# Altium PCB pcb.pcbdoc (part 1 of 2)
Units mil, origin at the board's own origin, x right, y up, seen from the top; angles counter-clockwise.
Board outline 4735 x 3735 mil, 2 copper layers (Top Layer, Bottom Layer); 22 components, 42 nets, 118 pads, 18 vias.
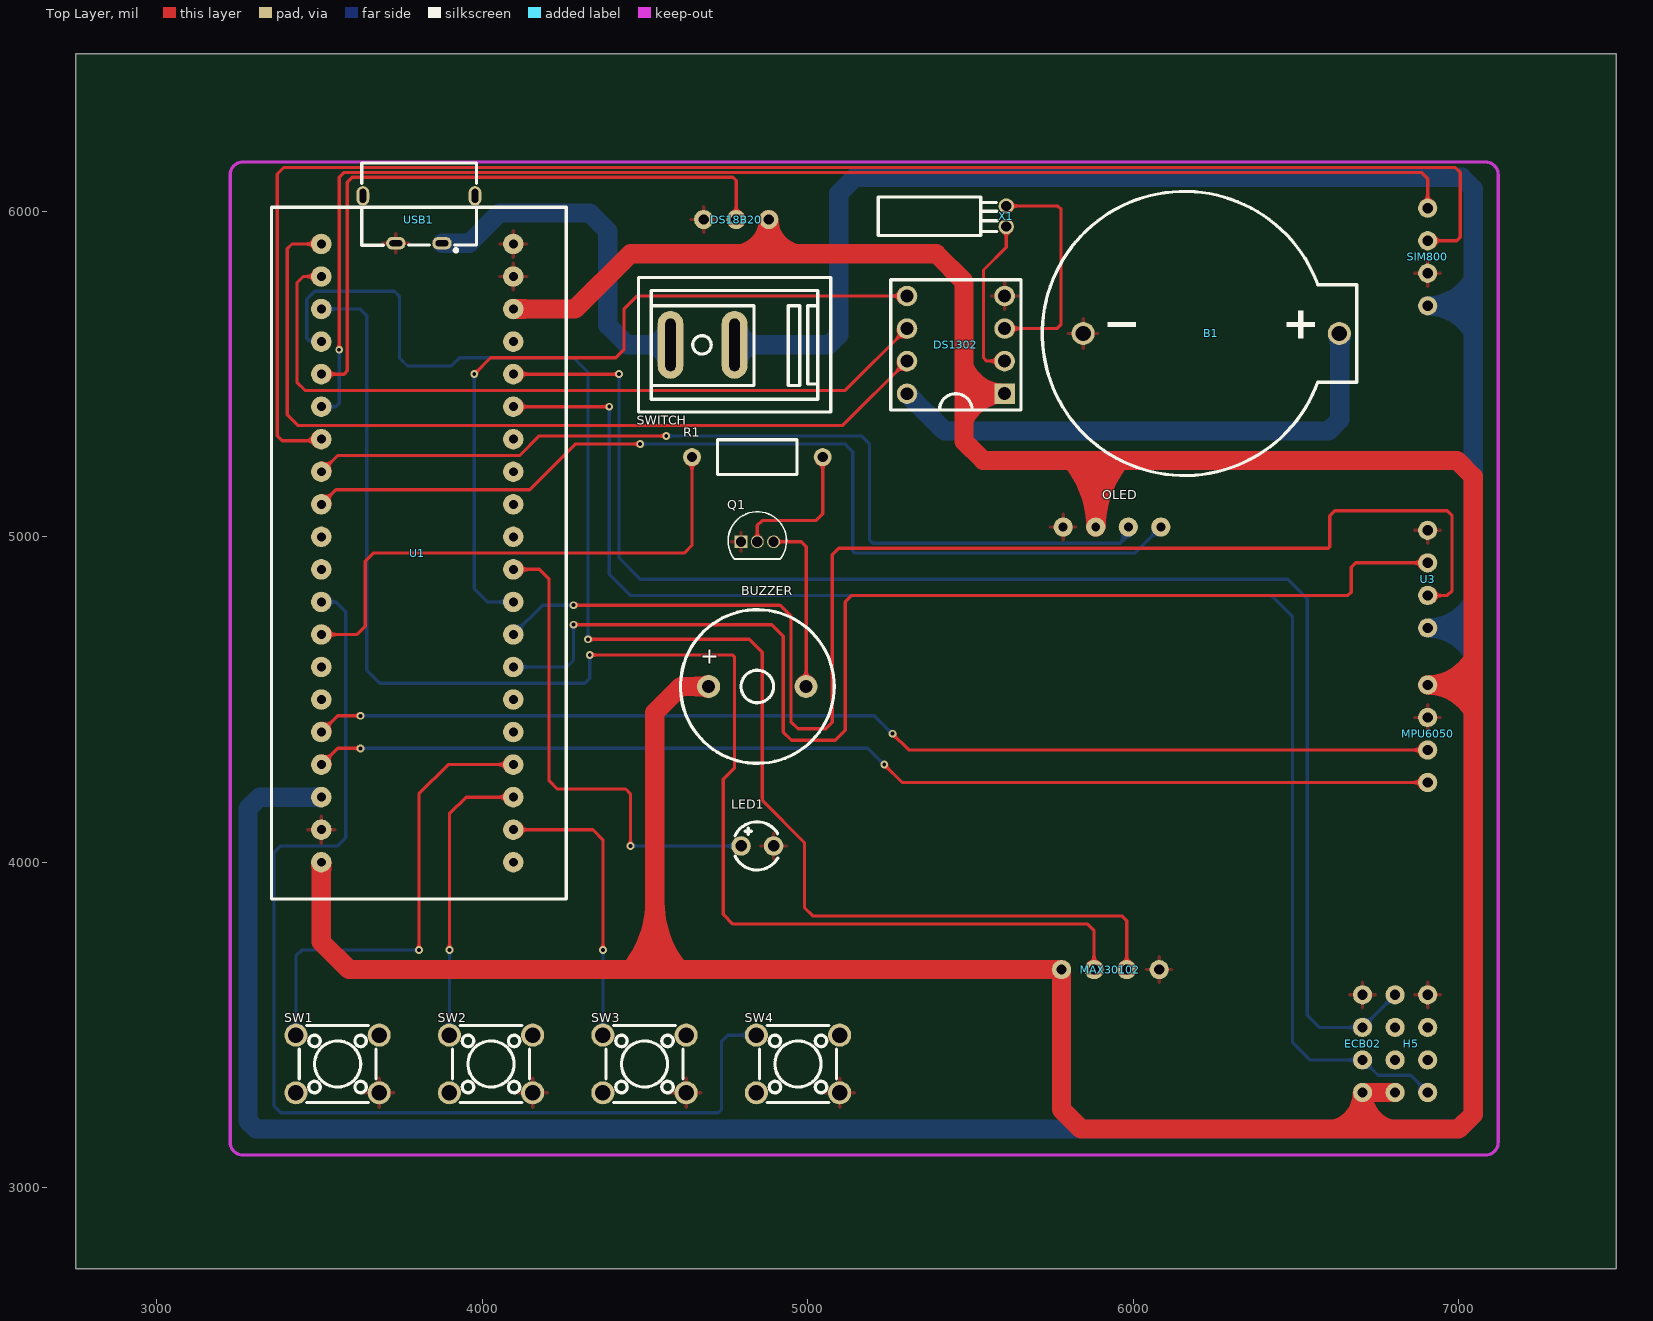
[diagram p0: Top Layer view]
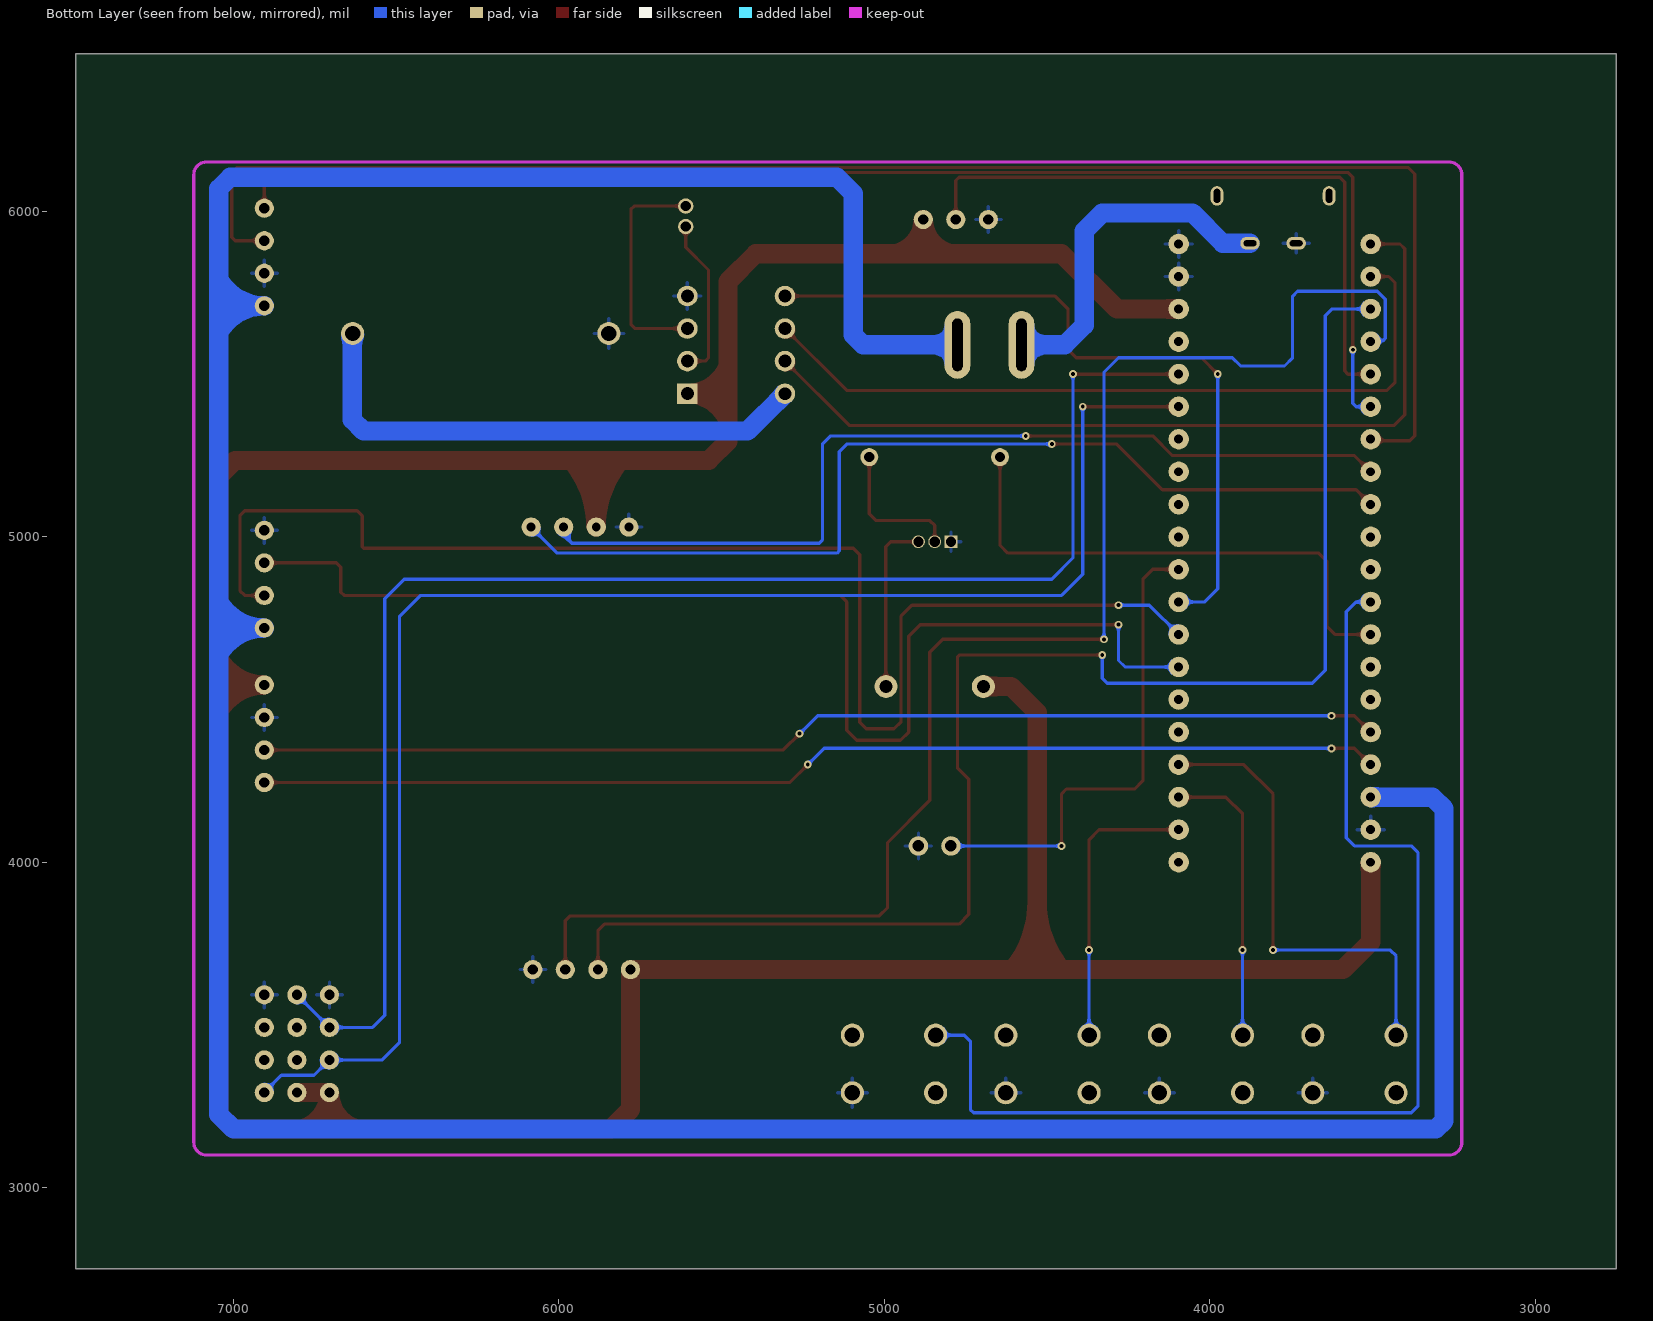
[diagram p1: Bottom Layer view, seen from below]

## Layer stack, top to bottom
Top Layer: signal copper (thickness not stored)
Dielectric: dielectric 12.6, FR-4, Dk 4.8
Bottom Layer: signal copper (thickness not stored)

## Board outline
7485,2750 2750,2750 2750,6485 7485,6485

## Design rules (kind name [scope] priority, off if disabled: settings)
Clearance copperThickness1oz [All] p1: gap=7 ignorepadtopadclearanceinfootprint=FALSE except(4: Track-Track; 6: Track-SMDPad SMDPad-SMDPad Track-THPad SMDPad-THPad THPad-THPad Track-Via SMDPad-Via THPad-Via Via-Via Track-Fill SMDPad-Fill THPad-Fill Via-Fill Fill-Fill SMDPad-Region THPad-Region Via-Region Fill-Region Region-Region SMDPad-Poly THPad-Poly Via-Poly Fill-Poly Poly-Poly Track-Text SMDPad-Text THPad-Text Via-Text Fill-Text Region-Text Text-Text Track-Sheet SMDPad-Sheet THPad-Sheet Via-Sheet Fill-Sheet Region-Sheet Poly-Sheet Text-Sheet Track-Hole SMDPad-Hole THPad-Hole Via-Hole Fill-Hole Region-Hole Poly-Hole Text-Hole Sheet-Hole; 11.8: Track-Region Track-Poly Region-Poly Poly-Text)
Clearance copperThickness2oz [All] p1: gap=7 ignorepadtopadclearanceinfootprint=FALSE except(6: Track-SMDPad SMDPad-SMDPad Track-THPad SMDPad-THPad THPad-THPad Track-Via SMDPad-Via THPad-Via Via-Via Track-Fill SMDPad-Fill THPad-Fill Via-Fill Fill-Fill SMDPad-Region THPad-Region Via-Region Fill-Region Region-Region SMDPad-Poly THPad-Poly Via-Poly Fill-Poly Poly-Poly Track-Text SMDPad-Text THPad-Text Via-Text Fill-Text Region-Text Text-Text Track-Sheet SMDPad-Sheet THPad-Sheet Via-Sheet Fill-Sheet Region-Sheet Poly-Sheet Text-Sheet Track-Hole SMDPad-Hole THPad-Hole Via-Hole Fill-Hole Region-Hole Poly-Hole Text-Hole Sheet-Hole; 8: Track-Track; 11.8: Track-Region Track-Poly Region-Poly Poly-Text)
DiffPairsRouting differentialPair [All] p1: maxuncoupledlength=10 maxlimit=6 mostfreqgap=6 toplayer_minwidth=5 toplayer_prefwidth=10 toplayer_maxwidth=100 bottomlayer_minwidth=5 bottomlayer_prefwidth=10 bottomlayer_maxwidth=100
PasteMaskExpansion pasteMaskExpansion [All] p1:
PlaneConnect innerPlane [All] p1: planeconnectstyle=Relief reliefexpansion=20 reliefentries=4 reliefconductorwidth=10 reliefairgap=10
PolygonConnect copperRegion [All] p1: connectstyle=Relief reliefentries=4 reliefconductorwidth=10 polygonreliefangle="90 Angle" airgapwidth=10
RoutingVias viaSize [All] p1: viastyle="Through Hole" holewidth=12.0078 minholewidth=11.811 maxholewidth=248.0314 width=24.0158 minwidth=19.685 maxwidth=393.7008
SolderMaskExpansion solderMaskExpansion [All] p1: useseparateexpansions=TRUE expansion=2 expansionbottom=2
Width copperThickness1oz [All] p1: maxlimit=100 minlimit=5 preferedwidth=10
Width copperThickness2oz [All] p1: maxlimit=100 minlimit=8 preferedwidth=10

## Components (designator, comment, footprint, x,y, rotation, side; value= is the part's Value field where it differs from the comment)
B1 "BS-02-A1AJ010" BAT-TH_BS-02-A1AJ010 6240,5625 r0 top
BUZZER "SUN-12075-5VPA7.6" BUZ-TH_BD12.0-P7.60-D0.6-FD 4845,4540 r0 top
DS18B20 "PZ254V-11-03P" HDR-TH_3P-P2.54-V-M 4780,5975 r0 top
DS1302 "DS1009-08AT1NX-0A2" DIP-8_L10.2-W10.2-P2.54-LS7.6-BL 5455,5590 r90 top
ECB02 "ECB02" HDR-TH_4P-P2.54-V-F 6705,3442.44 r270 top
H5 "ESP8266" HDR-TH_8P-P2.54-V-F-R2-C4-S2.54 6855,3442.44 r270 top
LED1 "LED" LED-TH_BD3.8-P2.54-FD_GREEN 4845,4050 r0 top
MAX30102 "MAX30102" HDR-TH_4P-P2.54-V-F 5930,3670 r180 top
MPU6050 "MPU6050" HDR-TH_4P-P2.54-V-F 6905,4395 r90 top
OLED "OLED" 0.96OLED_4P 5935,5030 r0 top
Q1 "SS8050_C2931495" TO-92-3_L4.6-W3.6-P1.27-L 4845,4985 r0 top
R1 "MF1/4W-1K±1%-ST52" RES-TH_BD2.7-L6.2-P10.20-D0.4 4845,5245 r0 top
SIM800 "SIM800" HDR-TH_4P-P2.54-V-F 6905,5860 r90 top
SW1 "TS665CJ" SW-TH_4P-L6.0-W6.0-P4.50-LS6.5 3555,3380 r0 top
SW2 "TS665CJ" SW-TH_4P-L6.0-W6.0-P4.50-LS6.5 4026.67,3380 r0 top
SW3 "TS665CJ" SW-TH_4P-L6.0-W6.0-P4.50-LS6.5 4498.33,3380 r0 top
SW4 "TS665CJ" SW-TH_4P-L6.0-W6.0-P4.50-LS6.5 4970,3380 r0 top
SWITCH "开关" KCD11-101 4775,5590 r0 top
U1 "STM32F103C8T6" STM32F103C8T6 3805,4950 r0 top
U3 "PZ254V-11-04P" HDR-TH_4P-P2.54-V-M 6905,4870 r270 top
USB1 "Type-C供电" USB-SMD_KH-TYPE-C-2P 3805,5975 r180 top
X1 "X308032768KGB2SC" OSC-TH_BD3.1-P0.8-D0.3 5610,5985 r0 top

## Footprints (in the part's own frame and the unit in brackets; to place one, negate y for a bottom-side part, rotate by r counter-clockwise, add the part's x,y. Pads: shape width x height; smd on the part's side, far side on the other; paste and mask are expansions set on the pad)
0.96OLED_4P [mm]
  round 1.5 hole 0.7 copper offset 0,0: 1(-3.81,-0.002) 2(-1.27,0.001) 3(1.27,0.001) 4(3.81,0.001)
BAT-TH_BS-02-A1AJ010 [mm]
  round 1.8 hole 1.2: 1(-10,0) 2(10,0)
  silkscreen extent -13.19,-11.09 11.36,11.09
BUZ-TH_BD12.0-P7.60-D0.6-FD [mil]
  round 70.9 hole 39.4: 1(-149.6,0) 2(149.6,0)
  silkscreen extent -236,-236 236,236
DIP-8_L10.2-W10.2-P2.54-LS7.6-BL [mm]
  rect 1.6x1.6 hole 1: 1(-3.808,-3.81)
  round 1.6 hole 1: 2(-1.27,-3.81) 3(1.27,-3.81) 4(3.81,-3.81) 5(3.81,3.81) 6(1.27,3.81) 7(-1.27,3.81) 8(-3.81,3.81)
  silkscreen extent -5.08,-5.08 5.08,5.08
HDR-TH_3P-P2.54-V-M [mm]
  round 1.5 hole 0.8: 1(-2.54,0) 2(0,0) 3(2.54,0)
HDR-TH_4P-P2.54-V-F [mm]
  round 1.5 hole 0.8: 1(-3.81,0) 2(-1.27,0) 3(1.27,0) 4(3.81,0)
HDR-TH_4P-P2.54-V-M [mm]
  round 1.5 hole 0.8: 1(-3.81,0) 2(-1.27,0) 3(1.27,0) 4(3.81,0)
HDR-TH_8P-P2.54-V-F-R2-C4-S2.54 [mm]
  round 1.5 hole 0.8: 1(-3.81,-1.27) 2(-3.81,1.27) 3(-1.27,-1.27) 4(-1.27,1.27) 5(1.27,-1.27) 6(1.27,1.27) 7(3.81,-1.27) 8(3.81,1.27)
KCD11-101 [mm]
  oval 2x5.3 hole 0.8 slot 4.1 at 90 deg: 1(0,0) 2(-5,0)
  silkscreen extent -7.5,-5.25 7.5,5.25
LED-TH_BD3.8-P2.54-FD_GREEN [mil]
  round 60 hole 35.43: 1(-50,0) 2(50,0)
  silkscreen extent -68,-74 63,74
OSC-TH_BD3.1-P0.8-D0.3 [mm]
  round 1.2 hole 0.8: 1(0,0.8) 2(0,-0.8)
  silkscreen extent -10,-1.5 -0.7,1.5
RES-TH_BD2.7-L6.2-P10.20-D0.4 [mm]
  round 1.4 hole 0.8 copper offset 0,0: 1(-5.1,0) 2(5.1,0)
  silkscreen extent -3.1,-1.35 3.1,1.35
STM32F103C8T6 [mm]
  round 1.6 hole 0.7: 1(-7.62,24.13) 2(-7.62,21.59) 3(-7.62,19.05) 4(-7.62,16.51) 5(-7.62,13.97) 6(-7.62,11.43) 7(-7.62,8.89) 8(-7.62,6.35) 9(-7.62,3.81) 10(-7.62,1.27) 11(-7.62,-1.27) 12(-7.62,-3.81) 13(-7.62,-6.35) 14(-7.62,-8.89) 15(-7.62,-11.43) 16(-7.62,-13.97) 17(-7.62,-16.51) 18(-7.62,-19.05) 19(-7.62,-21.59) 20(-7.62,-24.13) 21(7.366,-24.13) 22(7.366,-21.59) 23(7.366,-19.05) 24(7.366,-16.51) 25(7.366,-13.97) 26(7.366,-11.43) 27(7.366,-8.89) 28(7.366,-6.35) 29(7.366,-3.81) 30(7.366,-1.27) 31(7.366,1.27) 32(7.366,3.81) 33(7.366,6.35) 34(7.366,8.89) 35(7.366,11.43) 36(7.366,13.97) 37(7.366,16.51) 38(7.366,19.05) 39(7.366,21.59) 40(7.366,24.13)
  silkscreen extent -11.5,-27 11.5,27
SW-TH_4P-L6.0-W6.0-P4.50-LS6.5 [mm]
  round 1.8 hole 1.2: 1(-3.25,2.25) 2(3.25,2.25) 3(-3.25,-2.25) 4(3.25,-2.25)
  silkscreen extent -3,-3 3,3
TO-92-3_L4.6-W3.6-P1.27-L [mm]
  rect 1x1 hole 0.8: 1(-1.27,0)
  round 1 hole 0.8: 2(0,0) 3(1.27,0)
  silkscreen extent -2.28,-1.35 2.28,2.34
USB-SMD_KH-TYPE-C-2P [mm]
  oval 1.524x1 hole 0.45 slot 1 at 0 deg: 1(-1.8,1.85) 2(1.8,1.85)
  oval 1x1.524 hole 0.5 slot 1.1 at 90 deg: 3(4.375,-1.85) 4(-4.375,-1.85)
  silkscreen extent -4.5,-4.41 4.46,2.53

## Via types
v1: diameter 24.02, hole 12.01, Top Layer to Bottom Layer, 18 vias

## Nets (pads, with @x,y where several pads share a name; then routed paths per layer and width w, separated by ;. In a path a pad name is that pad's centre, name@x,y a point inside that pad or via, vN(x,y) a via of type N, cw(c..) or ccw(c..) an arc to the next point about the centre after c; other vN are vias at no path point)
3V3: BUZZER.1 DS18B20.3 DS1302.1 ECB02.4 H5.7 MAX30102.4 MPU6050.4 OLED.2 U1.20 U1.38 | length 11621.8
  Top Layer w59.06: U1.20@3505,4000 3505,3755 3590,3670 4529.94,3670 MAX30102.4@5780,3670 5780,3240 5840,3180 6705,3180 ; U1.38@4095,5700 4285,5700 4455,5870 4880,5870 ; 4530,3670.06 4530,4460 4610,4540 BUZZER.1@4695.4,4540 ; DS18B20.3@4880,5975 4880,5870 ; DS1302.1@5604.94,5440 5480,5440 ; OLED.2@5885.01,5030.04 5885.67,5030.72 5885.67,5234.33 5885,5235 ; H5.7@6805,3292.44 ECB02.4@6705,3292.44 6705,3180 ; MPU6050.4@6905,4545 7045,4545 ; 4880,5870 5395,5870 5480,5785 5480,5440 ; 5480,5440 5480,5294.06 5539.06,5235 5885,5235 ; 5885,5235 6995,5235 7045,5185 7045,4545 ; 6705,3180 7000,3180 7045,3225 7045,4545
5V: SWITCH.2 USB1.1 | length 1078.4
  Bottom Layer w59.06: USB1.1@3875.87,5902.16 3959.39,5902.16 4052.22,5995 4330,5995 4385,5940 4385,5650 4445,5590 SWITCH.2@4578.15,5590
5VOUT: SIM800.1 SWITCH.1 U1.18 U3.4 | length 10871.3
  Bottom Layer w59.06: U1.18@3505,4200 3315,4200 3280,4165 3280,3205 3305,3180 7000,3180 7045,3225 7045,4720 ; SWITCH.1@4775,5590 5065,5590 5095,5620 5095,6055 5145,6105 7010,6105 7045,6070 7045,5709.67 ; U3.4@6905,4720 7045,4720 ; SIM800.1@6905,5710 7044.67,5710 7045,5709.67 ; 7045,4720 7045,5709.67
$1N333: BUZZER.2 Q1.3 | length 536.4
  Top Layer w10: Q1.3@4895,4985 4980,4985 4995,4970 4995,4540.4 BUZZER.2@4994.6,4540
$1N1842: DS1302.2 X1.2 | length 501.6
  Top Layer w10: DS1302.2@5605,5540 5550,5540 5540,5550 5540,5820 5610,5890 X1.2@5610,5953.49
$1N1848: DS1302.3 X1.1 | length 704.7
  Top Layer w10: DS1302.3@5605,5640 5765,5640 5778.5,5653.5 5778.5,6006.5 5768.5,6016.5 X1.1@5610,6016.5
$1N1852: B1.2 DS1302.8 | length 1657.7
  Bottom Layer w59.06: DS1302.8@5305,5440 5420,5325 6600,5325 6635,5360 6635,5623.7 B1.2@6633.69,5625
$1N2304: Q1.2 R1.2 | length 439.8
  Top Layer w10: Q1.2@4845,4985 4845,5035 4860,5050 5025,5050 5045.79,5070.79 R1.2@5045.8,5245
GND: B1.1 DS18B20.1 DS1302.4 ECB02.1 H5.2 LED1.2 MAX30102.1 MPU6050.3 OLED.1 Q1.1 SIM800.2 SW1.4 SW2.4 SW3.4 SW4.4 U1.19 U1.39 U1.40 U3.1 USB1.2
PA0: U1.25
PA1: U1.26
PA2: U1.27 U3.2 | length 3750.1
  Top Layer w10: v1(4280,4730) 4890,4730 4925,4695 4925,4400 4950,4375 5085,4375 5115,4405 5115,4800 5135,4820 6175,4820 6660,4820 6670,4830 6670,4906.48 6683.52,4920 U3.2@6905,4920
  Bottom Layer w10: U1.27@4095,4600 4260,4600 4280,4620 v1(4280,4730)
PA3: U1.28 U3.3 | length 4222.3
  Top Layer w10: v1(4280,4790) 4915,4790 4948.17,4756.83 4948.17,4431.83 4970,4410 5055,4410 5075,4430 5075,4945 5095,4965 6600,4965 6604.13,4969.13 6604.13,5064.13 6620,5080 6965,5080 6980,5065 6980,4835 6965,4820 U3.3@6905,4820
  Bottom Layer w10: U1.28@4095,4700 4185,4790 v1(4280,4790)
PA4: DS1302.5 U1.29 | length 2299.2
  Top Layer w10: v1(3975,5500) 4025,5550 4410,5550 4435,5575 4435,5700 4475,5740 DS1302.5@5305,5740
  Bottom Layer w10: v1(3975,5500) 3975,4840 4015,4800 U1.29@4095,4800
PA5: LED1.1 U1.30 | length 1509
  Top Layer w10: U1.30@4095,4900 4175,4900 4205,4870 4205,4250 4230,4225 4440,4225 4455,4210 v1(4455,4050)
  Bottom Layer w10: v1(4455,4050) LED1.1@4795,4050
PA6: U1.31
PA7: U1.32
PA8: DS18B20.2 U1.5 | length 1989.5
  Top Layer w10: U1.5@3505,5500 3575,5500 3585,5510 3585,6090 3600,6105 4770,6105 4780,6095 DS18B20.2@4780,5975
PA9: SIM800.4 U1.6 | length 4203.6
  Top Layer w10: v1(3560,5575) 3560,6105 3575,6120 6885,6120 6905,6100 SIM800.4@6905,6010
  Bottom Layer w10: U1.6@3505,5400 3550,5400 3560,5410 v1(3560,5575)
PA10: SIM800.3 U1.7 | length 4901.9
  Top Layer w10: U1.7@3505,5300 3500,5295 3385,5295 3370,5310 3370,6115 3390,6135 6990,6135 7005,6120 7005,5920 6995,5910 SIM800.3@6905,5910
PA11: OLED.3 U1.8 | length 2870.5
  Top Layer w10: U1.8@3505,5200 3555,5250 4115,5250 4175,5310 v1(4565,5310)
  Bottom Layer w10: v1(4565,5310) 5165,5310 5190,5285 5190,4990 5200,4980 5960,4980 5985,5005 OLED.3@5985.01,5030.04
PA12: OLED.4 U1.9 | length 3007.2
  Top Layer w10: U1.9@3505,5100 3550,5145 4145,5145 4285,5285 v1(4485,5285)
  Bottom Layer w10: v1(4485,5285) 5115,5285 5137.93,5262.07 5137.93,4957.07 5145,4950 6004.95,4950 OLED.4@6085.01,5030.04
PA15: U1.10
PB0: U1.33
PB1: U1.34
PB3: U1.11
PB4: SW4.1 U1.12 | length 3513.2
  Bottom Layer w10: U1.12@3505,4800 3550,4800 3580,4770 3580,4075 3555,4050 3380,4050 3360,4030 3360,3250 3380,3230 4725,3230 4735,3240 4735,3450 4753.58,3468.58 SW4.1@4842.05,3468.58
PB5: R1.1 U1.13 | length 1640.7
  Top Layer w10: U1.13@3505,4700 3615,4700 3640,4725 3640,4925 3665,4950 4620,4950 4644.21,4974.21 R1.1@4644.2,5245
PB6: U1.14
PB7: U1.15
PB8: MPU6050.2 U1.16 | length 3464.2
  Top Layer w10: U1.16@3505,4400 3555,4450 v1(3625,4450) ; v1(5260,4395) 5310,4345 MPU6050.2@6905,4345
  Bottom Layer w10: v1(3625,4450) 5205,4450 v1(5260,4395)
PB9: MPU6050.1 U1.17 | length 3464.2
  Top Layer w10: U1.17@3505,4300 3555,4350 v1(3625,4350) ; v1(5235,4300) 5290,4245 MPU6050.1@6905,4245
  Bottom Layer w10: v1(3625,4350) 5185,4350 v1(5235,4300)
PB10: ECB02.3 H5.8 U1.35 | length 4752
  Top Layer w10: U1.35@4095,5400 v1(4390,5400)
  Bottom Layer w10: v1(4390,5400) 4390,4885 4455,4820 6425,4820 6490,4755 6490,3445 6542.54,3392.46 ECB02.3@6705,3392.44 6752.44,3345 6852.44,3345 H5.8@6905,3292.44
PB11: ECB02.2 H5.1 U1.36 | length 4677
  Top Layer w10: U1.36@4095,5500 v1(4420,5500)
  Bottom Layer w10: v1(4420,5500) 4420,4935 4485,4870 6475,4870 6535,4810 6535,3530 6572.54,3492.46 ECB02.2@6705,3492.46 ; ECB02.2@6718.28,3492.46 ECB02.2@6705.02,3492.46 ; H5.1@6805,3592.44 ECB02.2@6705.02,3492.46
PB12: DS1302.7 U1.1 | length 2621.5
  Top Layer w10: U1.1@3505,5900 3415,5900 3400,5885 3400,5375 3432.52,5342.48 5107.48,5342.48 DS1302.7@5305,5540
PB13: DS1302.6 U1.2 | length 2352.3
  Top Layer w10: U1.2@3505,5800 3450,5800 3430,5780 3430,5475 3455,5450 5115,5450 DS1302.6@5305,5640
PB14: MAX30102.3 U1.3 | length 4551.3
  Top Layer w10: v1(4330,4637.07) 4767.93,4637.07 4775,4630 4775,4290 4740,4255 4740,3840 4770,3810 5860,3810 5880,3790 MAX30102.3@5880,3670
  Bottom Layer w10: U1.3@3505,5700 3625,5700 3645,5680 3645,4590 3685,4550 4315,4550 4330,4565 v1(4330,4637.07)
PB15: MAX30102.2 U1.4 | length 4647
  Top Layer w10: v1(4325,4685) 4820,4685 4860,4645 4860,4190 4990,4060 4990,3860 5015,3835 5965,3835 5980,3820 MAX30102.2@5980,3670
  Bottom Layer w10: U1.4@3505,5600 3502.07,5602.93 3467.07,5602.93 3460,5610 3460,5730 3485,5755 3730,5755 3745,5740 3745,5550 3770,5525 3905,5525 3930,5550 4280,5550 4325,5505 v1(4325,4685)
PC13: SW3.1 U1.22 | length 889
  Top Layer w10: U1.22@4095,4100 4340,4100 4370.38,4069.62 v1(4370.38,3730)
  Bottom Layer w10: SW3.1@4370.39,3468.58 v1(4370.38,3730)
PC14: SW2.1 U1.23 | length 897.7
  Top Layer w10: v1(3898.72,3730) 3898.72,4148.72 3950,4200 U1.23@4095,4200
  Bottom Layer w10: SW2.1@3898.72,3468.58 v1(3898.72,3730)
PC15: 
VB: U1.21
pads on no net: H5.3 H5.4 H5.5 H5.6 SW1.1 SW1.2 SW1.3 SW2.2 SW2.3 SW3.2 SW3.3 SW4.2 SW4.3 U1.24 U1.37 USB1.3 USB1.4
copper on no net: | length 1436.1
  Top Layer w10: v1(3805,3730) 3805,4210 3895,4300 4095,4300
  Bottom Layer w10: 3427.05,3468.58 3427.05,3712.05 3445,3730 v1(3805,3730)

## Polygon pours and split planes (outlines as drawn)
GND on Top Layer (solid, remove dead copper): 3000,3000 7225,3000 7225,6165 3000,6165
GND on Bottom Layer (solid, remove dead copper, pour order 2): 3040,3000 7235,3000 7235,6235 3040,6235

## Keep-outs
Board Outline Layer:
  lines w10: 3225,3139.37 ccw(c3264.37,3139.37) 3264.37,3100 7082.64,3100 ccw(c7082.64,3139.37) 7122.01,3139.37 7122.01,6112.64 ccw(c7082.64,6112.64) 7082.64,6152.01 3264.37,6152.01 ccw(c3264.37,6112.64) 3225,6112.64 3225,3139.37

## Other copper
Top Layer:
  region net $1N333: 4990,4588.74 5000,4588.15 5000.12,4585.34 5000.48,4582.94 5001.05,4580.9 5001.83,4579.16 5002.79,4577.68 5003.93,4576.4 5005.22,4575.27 5006.65,4574.24 5013.47,4570.07 5015.37,4568.76 5017.32,4567.23 5019.29,4565.44 5021.29,4563.33 4968.45,4563.93 4970.46,4565.97 4972.47,4567.72 4976.36,4570.53 4980,4572.75 4983.26,4574.77 4984.71,4575.83 4986.02,4576.98 4987.17,4578.29 4988.15,4579.79 4988.93,4581.54 4989.52,4583.58 4989.88,4585.96
  region net 3V3: 4652.86,4510.47 4652.86,4569.53 4660.75,4569.78 4668.34,4570.45 4675.4,4571.4 4681.73,4572.49 4691.32,4574.52 4695.4,4575.45 4695.4,4504.55 4691.32,4505.48 4681.73,4507.51 4675.4,4508.6 4668.34,4509.55 4660.75,4510.22
  region net 3V3: 5856.14,5051.39 5915.2,5079.58 5915.11,5078.95 5914.86,5078.3 5913.91,5076.89 5912.44,5075.39 5910.57,5073.81 5905.95,5070.56 5900.85,5067.33 5896.05,5064.35 5892.33,5061.81 5891.11,5060.77 5890.46,5059.92 5890.38,5059.58 5890.48,5059.3 5890.76,5059.07 5891.25,5058.91 5855.48,5030.72 5855.87,5041.05
  region net PB12: 3461.96,5895 3461.96,5905 3464.37,5905.11 3466.46,5905.41 3468.25,5905.91 3469.79,5906.59 3471.13,5907.42 3472.3,5908.41 3473.34,5909.53 3474.3,5910.77 3478.15,5916.69 3480.66,5920.03 3482.21,5921.75 3484,5923.48 3484,5876.52 3482.21,5878.25 3480.66,5879.97 3478.15,5883.31 3474.3,5889.23 3473.34,5890.47 3472.3,5891.59 3471.13,5892.58 3469.79,5893.41 3468.25,5894.09 3466.46,5894.59 3464.37,5894.89
  region net PB13: 3461.96,5795 3461.96,5805 3464.37,5805.11 3466.46,5805.41 3468.25,5805.91 3469.79,5806.59 3471.13,5807.42 3472.3,5808.41 3473.34,5809.53 3474.3,5810.77 3478.15,5816.69 3480.66,5820.03 3482.21,5821.75 3484,5823.48 3484,5776.52 3482.21,5778.25 3480.66,5779.97 3478.15,5783.31 3474.3,5789.23 3473.34,5790.47 3472.3,5791.59 3471.13,5792.58 3469.79,5793.41 3468.25,5794.09 3466.46,5794.59 3464.37,5794.89
  region net PA8: 3548.04,5505 3548.04,5495 3545.63,5494.89 3543.54,5494.59 3541.75,5494.09 3540.21,5493.41 3538.87,5492.58 3537.7,5491.59 3536.66,5490.47 3535.7,5489.23 3531.85,5483.31 3529.34,5479.97 3527.79,5478.25 3526,5476.52 3526,5523.48 3527.79,5521.75 3529.34,5520.03 3531.85,5516.69 3535.7,5510.77 3536.66,5509.53 3537.7,5508.41 3538.87,5507.42 3540.21,5506.59 3541.75,5505.91 3543.54,5505.41 3545.63,5505.11
  region net PA10: 3465.95,5290 3458.49,5300 3460.76,5300.11 3462.78,5300.45 3464.58,5300.98 3466.2,5301.71 3467.65,5302.6 3468.96,5303.66 3470.17,5304.87 3471.29,5306.2 3473.4,5309.21 3475.5,5312.56 3477.81,5316.14 3480.54,5319.84 3488,5273.49 3485.51,5275.38 3482.91,5277.81 3477.43,5283.29 3474.59,5285.86 3471.71,5288 3470.27,5288.83 3468.83,5289.46 3467.39,5289.86
  region net PA11: 3531.9,5233.97 3538.97,5226.9 3537.34,5225.12 3536.08,5223.42 3535.17,5221.8 3534.55,5220.24 3534.2,5218.7 3534.07,5217.18 3534.13,5215.65 3534.32,5214.09 3535.79,5207.18 3536.38,5203.05 3536.49,5200.74 3536.45,5198.25 3503.25,5231.45 3505.74,5231.49 3508.05,5231.38 3512.18,5230.79 3519.09,5229.32 3520.65,5229.13 3522.18,5229.07 3523.7,5229.2 3525.24,5229.55 3526.8,5230.17 3528.42,5231.08 3530.12,5232.34
  region net PA12: 3531.9,5133.97 3538.97,5126.9 3537.34,5125.12 3536.08,5123.42 3535.17,5121.8 3534.55,5120.24 3534.2,5118.7 3534.07,5117.18 3534.13,5115.65 3534.32,5114.09 3535.79,5107.18 3536.38,5103.05 3536.49,5100.74 3536.45,5098.25 3503.25,5131.45 3505.74,5131.49 3508.05,5131.38 3512.18,5130.79 3519.09,5129.32 3520.65,5129.13 3522.18,5129.07 3523.7,5129.2 3525.24,5129.55 3526.8,5130.17 3528.42,5131.08 3530.12,5132.34
  region net PB5: 3548.04,4705 3548.04,4695 3545.63,4694.89 3543.54,4694.59 3541.75,4694.09 3540.21,4693.41 3538.87,4692.58 3537.7,4691.59 3536.66,4690.47 3535.7,4689.23 3531.85,4683.31 3529.34,4679.97 3527.79,4678.25 3526,4676.52 3526,4723.48 3527.79,4721.75 3529.34,4720.03 3531.85,4716.69 3535.7,4710.77 3536.66,4709.53 3537.7,4708.41 3538.87,4707.42 3540.21,4706.59 3541.75,4705.91 3543.54,4705.41 3545.63,4705.11
  region net PB8: 3531.9,4433.97 3538.97,4426.9 3537.34,4425.12 3536.08,4423.42 3535.17,4421.8 3534.55,4420.24 3534.2,4418.7 3534.07,4417.18 3534.13,4415.65 3534.32,4414.09 3535.79,4407.18 3536.38,4403.05 3536.49,4400.74 3536.45,4398.25 3503.25,4431.45 3505.74,4431.49 3508.05,4431.38 3512.18,4430.79 3519.09,4429.32 3520.65,4429.13 3522.18,4429.07 3523.7,4429.2 3525.24,4429.55 3526.8,4430.17 3528.42,4431.08 3530.12,4432.34
  region net PB9: 3531.9,4333.97 3538.97,4326.9 3537.34,4325.12 3536.08,4323.42 3535.17,4321.8 3534.55,4320.24 3534.2,4318.7 3534.07,4317.18 3534.13,4315.65 3534.32,4314.09 3535.79,4307.18 3536.38,4303.05 3536.49,4300.74 3536.45,4298.25 3503.25,4331.45 3505.74,4331.49 3508.05,4331.38 3512.18,4330.79 3519.09,4329.32 3520.65,4329.13 3522.18,4329.07 3523.7,4329.2 3525.24,4329.55 3526.8,4330.17 3528.42,4331.08 3530.12,4332.34
  region net 3V3: 3534.53,3962.2 3475.47,3962.2 3475.39,3969.21 3475.16,3975.94 3474.49,3987.81 3473.5,4000 3536.5,4000 3535.51,3987.81 3534.84,3975.94 3534.61,3969.21
  region net PC13: 4138.04,4105 4138.04,4095 4135.63,4094.89 4133.54,4094.59 4131.75,4094.09 4130.21,4093.41 4128.87,4092.58 4127.7,4091.59 4126.66,4090.47 4125.7,4089.23 4121.85,4083.31 4119.34,4079.97 4117.79,4078.25 4116,4076.52 4116,4123.48 4117.79,4121.75 4119.34,4120.03 4121.85,4116.69 4125.7,4110.77 4126.66,4109.53 4127.7,4108.41 4128.87,4107.42 4130.21,4106.59 4131.75,4105.91 4133.54,4105.41 4135.63,4105.11
  region net PC14: 4051.96,4195 4051.96,4205 4054.37,4205.11 4056.46,4205.41 4058.25,4205.91 4059.79,4206.59 4061.13,4207.42 4062.3,4208.41 4063.34,4209.53 4064.3,4210.77 4068.15,4216.69 4070.66,4220.03 4072.21,4221.75 4074,4223.48 4074,4176.52 4072.21,4178.25 4070.66,4179.97 4068.15,4183.31 4064.3,4189.23 4063.34,4190.47 4062.3,4191.59 4061.13,4192.58 4059.79,4193.41 4058.25,4194.09 4056.46,4194.59 4054.37,4194.89
  region: 4051.96,4295 4051.96,4305 4054.37,4305.11 4056.46,4305.41 4058.25,4305.91 4059.79,4306.59 4061.13,4307.42 4062.3,4308.41 4063.34,4309.53 4064.3,4310.77 4068.15,4316.69 4070.66,4320.03 4072.21,4321.75 4074,4323.48 4074,4276.52 4072.21,4278.25 4070.66,4279.97 4068.15,4283.31 4064.3,4289.23 4063.34,4290.47 4062.3,4291.59 4061.13,4292.58 4059.79,4293.41 4058.25,4294.09 4056.46,4294.59 4054.37,4294.89
  region net PA5: 4138.04,4905 4138.04,4895 4135.63,4894.89 4133.54,4894.59 4131.75,4894.09 4130.21,4893.41 4128.87,4892.58 4127.7,4891.59 4126.66,4890.47 4125.7,4889.23 4121.85,4883.31 4119.34,4879.97 4117.79,4878.25 4116,4876.52 4116,4923.48 4117.79,4921.75 4119.34,4920.03 4121.85,4916.69 4125.7,4910.77 4126.66,4909.53 4127.7,4908.41 4128.87,4907.42 4130.21,4906.59 4131.75,4905.91 4133.54,4905.41 4135.63,4905.11
  region net PB10: 4138.04,5405 4138.04,5395 4135.63,5394.89 4133.54,5394.59 4131.75,5394.09 4130.21,5393.41 4128.87,5392.58 4127.7,5391.59 4126.66,5390.47 4125.7,5389.23 4121.85,5383.31 4119.34,5379.97 4117.79,5378.25 4116,5376.52 4116,5423.48 4117.79,5421.75 4119.34,5420.03 4121.85,5416.69 4125.7,5410.77 4126.66,5409.53 4127.7,5408.41 4128.87,5407.42 4130.21,5406.59 4131.75,5405.91 4133.54,5405.41 4135.63,5405.11
  region net PB11: 4138.04,5505 4138.04,5495 4135.63,5494.89 4133.54,5494.59 4131.75,5494.09 4130.21,5493.41 4128.87,5492.58 4127.7,5491.59 4126.66,5490.47 4125.7,5489.23 4121.85,5483.31 4119.34,5479.97 4117.79,5478.25 4116,5476.52 4116,5523.48 4117.79,5521.75 4119.34,5520.03 4121.85,5516.69 4125.7,5510.77 4126.66,5509.53 4127.7,5508.41 4128.87,5507.42 4130.21,5506.59 4131.75,5505.91 4133.54,5505.41 4135.63,5505.11
  region net 3V3: 4132.8,5729.53 4132.8,5670.47 4125.79,5670.39 4119.06,5670.16 4107.19,5669.49 4095,5668.5 4095,5731.5 4107.19,5730.51 4119.06,5729.84 4125.79,5729.61
  region net PB12: 5278.1,5506.03 5271.03,5513.1 5272.66,5514.88 5273.92,5516.58 5274.83,5518.2 5275.45,5519.76 5275.8,5521.3 5275.93,5522.82 5275.87,5524.35 5275.68,5525.91 5274.21,5532.82 5273.62,5536.95 5273.51,5539.26 5273.55,5541.75 5306.75,5508.55 5304.26,5508.51 5301.95,5508.63 5297.82,5509.21 5290.91,5510.68 5289.35,5510.88 5287.82,5510.93 5286.3,5510.8 5284.76,5510.45 5283.2,5509.83 5281.58,5508.92 5279.88,5507.66
  region net PB13: 5278.1,5606.03 5271.03,5613.1 5272.66,5614.88 5273.92,5616.58 5274.83,5618.2 5275.45,5619.76 5275.8,5621.3 5275.93,5622.82 5275.87,5624.35 5275.68,5625.91 5274.21,5632.82 5273.62,5636.95 5273.51,5639.26 5273.55,5641.75 5306.75,5608.55 5304.26,5608.51 5301.95,5608.63 5297.82,5609.21 5290.91,5610.68 5289.35,5610.88 5287.82,5610.93 5286.3,5610.8 5284.76,5610.45 5283.2,5609.83 5281.58,5608.92 5279.88,5607.66
  region net PA4: 5261.96,5735 5261.96,5745 5264.37,5745.11 5266.46,5745.42 5268.25,5745.91 5269.79,5746.59 5271.13,5747.43 5272.3,5748.41 5273.34,5749.53 5274.3,5750.77 5278.15,5756.69 5280.66,5760.03 5282.21,5761.75 5284,5763.48 5284,5716.53 5282.21,5718.26 5280.66,5719.97 5278.15,5723.31 5274.3,5729.23 5273.34,5730.47 5272.3,5731.59 5271.13,5732.58 5269.79,5733.41 5268.25,5734.09 5266.46,5734.59 5264.37,5734.9
  region net $1N1848: 5648.05,5645 5648.04,5635 5645.63,5634.89 5643.54,5634.59 5641.75,5634.09 5640.21,5633.41 5638.87,5632.58 5637.7,5631.59 5636.66,5630.47 5635.7,5629.23 5631.85,5623.31 5629.34,5619.97 5627.79,5618.25 5626,5616.52 5626,5663.48 5627.8,5661.75 5629.34,5660.03 5631.85,5656.69 5635.7,5650.77 5636.66,5649.53 5637.7,5648.41 5638.87,5647.42 5640.21,5646.59 5641.75,5645.91 5643.54,5645.41 5645.63,5645.11
  region net $1N1842: 5561.96,5535 5561.96,5545 5564.37,5545.11 5566.46,5545.42 5568.25,5545.91 5569.79,5546.59 5571.13,5547.43 5572.3,5548.41 5573.34,5549.53 5574.3,5550.77 5578.15,5556.69 5580.66,5560.03 5582.21,5561.75 5584,5563.48 5584,5516.53 5582.21,5518.26 5580.66,5519.97 5578.15,5523.31 5574.3,5529.23 5573.34,5530.47 5572.3,5531.59 5571.13,5532.58 5569.79,5533.41 5568.25,5534.09 5566.46,5534.59 5564.37,5534.9
  region net 3V3: 5484.92,5410.47 5484.92,5469.53 ccw(c5484.92,7403.77) 5573.5,5471.56 5573.5,5408.56 ccw(c5484.92,3352.6)
  region net $1N1848: 5642.28,6021.5 5642.28,6011.5 5640.62,6011.42 5639.15,6011.21 5637.85,6010.87 5636.7,6010.41 5634.76,6009.17 5633.11,6007.56 5629.98,6003.52 5628.1,6001.24 5625.75,5998.89 5625.75,6034.1 5628.1,6031.75 5629.98,6029.47 5633.11,6025.44 5634.76,6023.82 5636.7,6022.58 5637.85,6022.12 5639.15,6021.78 5640.62,6021.57
  region net $1N1842: 5615,5921.21 5605,5921.21 5604.93,5922.88 5604.72,5924.35 5604.38,5925.65 5603.92,5926.8 5602.67,5928.74 5601.06,5930.38 5597.02,5933.52 5594.75,5935.4 5592.39,5937.75 5627.61,5937.75 5625.26,5935.4 5622.98,5933.52 5618.94,5930.38 5617.33,5928.74 5616.08,5926.8 5615.62,5925.65 5615.28,5924.35 5615.07,5922.88
  region net $1N2304: 4840,5011.9 4850,5011.9 4850.22,5009.45 4850.83,5007.45 4851.79,5005.78 4853.02,5004.32 4856.12,5001.54 4857.87,4999.97 4859.67,4998.12 4830.33,4998.12 4832.13,4999.97 4833.88,5001.54 4836.98,5004.32 4838.21,5005.78 4839.17,5007.45 4839.78,5009.45
  region net $1N333: 4921.9,4990 4921.9,4980 4919.45,4979.78 4917.45,4979.17 4915.78,4978.21 4914.32,4976.98 4911.54,4973.88 4909.97,4972.13 4908.12,4970.33 4908.12,4999.67 4909.97,4997.87 4911.54,4996.12 4914.32,4993.02 4915.78,4991.79 4917.45,4990.83 4919.45,4990.22
  region net PB5: 4649.21,5207.34 4639.21,5207.34 4639.12,5209.38 4638.86,5211.16 4638.44,5212.7 4637.87,5214.05 4637.17,5215.23 4636.34,5216.27 4634.35,5218.09 4629.38,5221.59 4626.57,5223.78 4623.67,5226.63 4664.75,5226.63 4661.85,5223.78 4659.04,5221.59 4654.07,5218.09 4652.08,5216.27 4651.25,5215.23 4650.55,5214.05 4649.98,5212.7 4649.56,5211.16 4649.3,5209.38
  region net $1N2304: 5050.79,5207.34 5040.79,5207.34 5040.7,5209.38 5040.44,5211.16 5040.02,5212.7 5039.45,5214.05 5038.75,5215.23 5037.92,5216.27 5035.93,5218.09 5030.96,5221.59 5028.15,5223.78 5025.25,5226.63 5066.33,5226.63 5063.43,5223.78 5060.62,5221.59 5055.65,5218.09 5053.66,5216.27 5052.83,5215.23 5052.13,5214.05 5051.56,5212.7 5051.14,5211.16 5050.88,5209.38
  region net PB9: 6864.65,4240 6864.65,4250 6866.88,4250.1 6868.81,4250.38 6870.48,4250.84 6871.92,4251.46 6873.18,4252.23 6874.28,4253.14 6876.2,4255.32 6879.87,4260.76 6882.22,4263.84 6883.66,4265.42 6885.31,4267.01 6885.31,4222.99 6883.66,4224.58 6882.22,4226.16 6879.87,4229.24 6876.2,4234.68 6874.28,4236.86 6873.18,4237.77 6871.92,4238.54 6870.48,4239.16 6868.81,4239.62 6866.88,4239.9
  region net PB8: 6864.65,4340 6864.65,4350 6866.88,4350.1 6868.81,4350.38 6870.48,4350.84 6871.92,4351.46 6873.18,4352.23 6874.28,4353.14 6876.2,4355.32 6879.87,4360.76 6882.22,4363.84 6883.66,4365.42 6885.31,4367.01 6885.31,4322.99 6883.66,4324.58 6882.22,4326.16 6879.87,4329.24 6876.2,4334.68 6874.28,4336.86 6873.18,4337.77 6871.92,4338.54 6870.48,4339.16 6868.81,4339.62 6866.88,4339.9
  region net PB15: 5975,3710.35 5985,3710.35 5985.1,3708.12 5985.38,3706.19 5985.84,3704.52 5986.46,3703.08 5987.23,3701.82 5988.14,3700.72 5990.32,3698.8 5995.76,3695.13 5998.84,3692.78 6000.42,3691.34 6002.01,3689.68 5957.99,3689.68 5959.58,3691.34 5961.16,3692.78 5964.24,3695.13 5969.68,3698.8 5971.86,3700.72 5972.77,3701.82 5973.54,3703.08 5974.16,3704.52 5974.62,3706.19 5974.9,3708.12
  region net PB14: 5875,3710.35 5885,3710.35 5885.1,3708.12 5885.38,3706.19 5885.84,3704.52 5886.46,3703.08 5887.23,3701.82 5888.14,3700.72 5890.32,3698.8 5895.76,3695.13 5898.84,3692.78 5900.42,3691.34 5902.01,3689.68 5857.99,3689.68 5859.58,3691.34 5861.16,3692.78 5864.24,3695.13 5869.68,3698.8 5871.86,3700.72 5872.77,3701.82 5873.54,3703.08 5874.16,3704.52 5874.62,3706.19 5874.9,3708.12
  region net PA10: 6945.35,5915 6945.35,5905 6943.12,5904.9 6941.19,5904.62 6939.52,5904.16 6938.08,5903.54 6936.82,5902.77 6935.72,5901.86 6933.8,5899.68 6930.13,5894.24 6927.78,5891.16 6926.34,5889.58 6924.69,5887.99 6924.69,5932.01 6926.34,5930.42 6927.78,5928.84 6930.13,5925.76 6933.8,5920.32 6935.72,5918.14 6936.82,5917.23 6938.08,5916.46 6939.52,5915.84 6941.19,5915.38 6943.12,5915.1
  region net PA9: 6900,6050.35 6910,6050.35 6910.1,6048.12 6910.38,6046.19 6910.84,6044.52 6911.46,6043.08 6912.23,6041.82 6913.14,6040.72 6915.32,6038.8 6920.76,6035.13 6923.84,6032.78 6925.42,6031.34 6927.01,6029.69 6882.99,6029.69 6884.58,6031.34 6886.16,6032.78 6889.24,6035.13 6894.68,6038.8 6896.86,6040.72 6897.77,6041.82 6898.54,6043.08 6899.16,6044.52 6899.62,6046.19 6899.9,6048.12
  region net PA8: 4775,6015.35 4785,6015.35 4785.1,6013.12 4785.38,6011.19 4785.84,6009.52 4786.46,6008.08 4787.23,6006.82 4788.14,6005.72 4790.32,6003.8 4795.76,6000.13 4798.84,5997.78 4800.42,5996.34 4802.01,5994.69 4757.99,5994.69 4759.58,5996.34 4761.16,5997.78 4764.24,6000.13 4769.68,6003.8 4771.86,6005.72 4772.77,6006.82 4773.54,6008.08 4774.16,6009.52 4774.62,6011.19 4774.9,6013.12
  region net PA2: 6864.65,4915 6864.65,4925 6866.88,4925.1 6868.81,4925.38 6870.48,4925.84 6871.92,4926.46 6873.18,4927.23 6874.28,4928.14 6876.2,4930.32 6879.87,4935.76 6882.22,4938.84 6883.66,4940.42 6885.31,4942.01 6885.31,4897.99 6883.66,4899.58 6882.22,4901.16 6879.87,4904.24 6876.2,4909.68 6874.28,4911.86 6873.18,4912.77 6871.92,4913.54 6870.48,4914.16 6868.81,4914.62 6866.88,4914.9
  region net PA3: 6945.35,4825 6945.35,4815 6943.12,4814.9 6941.19,4814.62 6939.52,4814.16 6938.08,4813.54 6936.82,4812.77 6935.72,4811.86 6933.8,4809.68 6930.13,4804.24 6927.78,4801.16 6926.34,4799.58 6924.69,4797.99 6924.69,4842.01 6926.34,4840.42 6927.78,4838.84 6930.13,4835.76 6933.8,4830.32 6935.72,4828.14 6936.82,4827.23 6938.08,4826.46 6939.52,4825.84 6941.19,4825.38 6943.12,4825.1
  region: 3800,3746.41 3810,3746.41 3810.09,3745.29 3810.34,3744.16 3811.23,3741.93 3812.5,3739.83 3813.95,3738.01 3796.05,3738.01 3797.5,3739.83 3798.77,3741.93 3799.66,3744.16 3799.91,3745.29
  region net PC14: 3893.72,3746.41 3903.72,3746.41 3903.81,3745.29 3904.06,3744.16 3904.95,3741.93 3906.22,3739.83 3907.67,3738.01 3889.77,3738.01 3891.22,3739.83 3892.48,3741.93 3893.38,3744.16 3893.63,3745.29
  region net PC13: 4365.38,3746.41 4375.38,3746.41 4375.47,3745.29 4375.72,3744.16 4376.62,3741.93 4377.88,3739.83 4379.33,3738.01 4361.43,3738.01 4362.88,3739.83 4364.15,3741.93 4365.04,3744.16 4365.29,3745.29
  region net PA5: 4450,4066.41 4460,4066.41 4460.09,4065.29 4460.34,4064.16 4461.23,4061.93 4462.5,4059.83 4463.95,4058.01 4446.05,4058.01 4447.5,4059.83 4448.77,4061.93 4449.66,4064.16 4449.91,4065.29
  region net PA4: 3983.07,5515.14 3990.14,5508.07 3989.41,5507.21 3988.79,5506.24 3987.84,5504.02 3987.26,5501.65 3986.99,5499.33 3974.33,5511.99 3976.65,5512.26 3979.02,5512.84 3981.24,5513.79 3982.21,5514.41
  region net PA2: 4296.41,4735 4296.41,4725 4295.29,4724.91 4294.16,4724.66 4291.93,4723.77 4289.83,4722.5 4288.01,4721.05 4288.01,4738.95 4289.83,4737.5 4291.93,4736.23 4294.16,4735.34 4295.29,4735.09
  region net PA3: 4296.41,4795 4296.41,4785 4295.29,4784.91 4294.16,4784.66 4291.93,4783.77 4289.83,4782.5 4288.01,4781.05 4288.01,4798.95 4289.83,4797.5 4291.93,4796.23 4294.16,4795.34 4295.29,4795.09
  region net PA11: 4548.59,5305 4548.59,5315 4549.71,5315.09 4550.84,5315.34 4553.07,5316.23 4555.17,5317.5 4556.99,5318.95 4556.99,5301.05 4555.17,5302.5 4553.07,5303.77 4550.84,5304.66 4549.71,5304.91
  region net PA12: 4468.59,5280 4468.59,5290 4469.71,5290.09 4470.84,5290.34 4473.07,5291.23 4475.17,5292.5 4476.99,5293.95 4476.99,5276.05 4475.17,5277.5 4473.07,5278.77 4470.84,5279.66 4469.71,5279.91
  region net PB14: 4346.41,4642.07 4346.41,4632.07 4345.29,4631.98 4344.16,4631.73 4341.93,4630.84 4339.83,4629.57 4338.01,4628.12 4338.01,4646.02 4339.83,4644.57 4341.93,4643.31 4344.16,4642.41 4345.29,4642.16
  region net PB15: 4341.41,4690 4341.41,4680 4340.29,4679.91 4339.16,4679.66 4336.93,4678.77 4334.83,4677.5 4333.01,4676.05 4333.01,4693.95 4334.83,4692.5 4336.93,4691.23 4339.16,4690.34 4340.29,4690.09
  region net PB9: 5250.14,4291.93 5243.07,4284.86 5242.21,4285.59 5241.24,4286.21 5239.02,4287.16 5236.65,4287.74 5234.33,4288.01 5246.99,4300.67 5247.26,4298.35 5247.84,4295.98 5248.79,4293.76 5249.41,4292.79
  region net PB9: 3608.59,4345 3608.59,4355 3609.71,4355.09 3610.84,4355.34 3613.07,4356.23 3615.17,4357.5 3616.99,4358.95 3616.99,4341.05 3615.17,4342.5 3613.07,4343.77 3610.84,4344.66 3609.71,4344.91
  region net PB8: 5275.14,4386.93 5268.07,4379.86 5267.21,4380.59 5266.24,4381.21 5264.02,4382.16 5261.65,4382.74 5259.33,4383.01 5271.99,4395.67 5272.26,4393.35 5272.84,4390.98 5273.79,4388.76 5274.41,4387.79
  region net PB8: 3608.59,4445 3608.59,4455 3609.71,4455.09 3610.84,4455.34 3613.07,4456.23 3615.17,4457.5 3616.99,4458.95 3616.99,4441.05 3615.17,4442.5 3613.07,4443.77 3610.84,4444.66 3609.71,4444.91
  region net PB11: 4403.59,5495 4403.59,5505 4404.71,5505.09 4405.84,5505.34 4408.07,5506.23 4410.17,5507.5 4411.99,5508.95 4411.99,5491.05 4410.17,5492.5 4408.07,5493.77 4405.84,5494.66 4404.71,5494.91
  region net PB10: 4373.59,5395 4373.59,5405 4374.71,5405.09 4375.84,5405.34 4378.07,5406.23 4380.17,5407.5 4381.99,5408.95 4381.99,5391.05 4380.17,5392.5 4378.07,5393.77 4375.84,5394.66 4374.71,5394.91
  region net PA9: 3555,5591.41 3565,5591.41 3565.09,5590.29 3565.34,5589.16 3566.23,5586.93 3567.5,5584.83 3568.95,5583.01 3551.05,5583.01 3552.5,5584.83 3553.77,5586.93 3554.66,5589.16 3554.91,5590.29
  region net 3V3: 5604.94,5469.53 cw(c5604.94,5576.13) 5509.53,5528.58 5480,5440 5509.53,5351.42 cw(c5604.94,5303.87) 5604.94,5410.47
  region net 3V3: 4500.47,3876.69 cw(c4205.2,3876.69) 4441.42,3699.53 4529.94,3670 4618.58,3699.53 cw(c4854.8,3876.69) 4559.53,3876.69
  region net 3V3: 5915.2,5030.72 cw(c6203.29,5030.72) 5974.25,5205.47 5885,5235 5797.09,5205.47 cw(c5568.05,5030.72) 5856.14,5030.72
  region net 3V3: 6675.47,3292.44 cw(c6587.74,3292.44) 6616.42,3209.53 6705,3180 6793.58,3209.53 cw(c6822.26,3292.44) 6734.53,3292.44
  region net 3V3: 6905,4515.47 cw(c6905,4382.62) 7015.47,4456.42 7045,4545 7015.47,4633.58 cw(c6905,4707.38) 6905,4574.53
  region net 3V3: 4850.47,5975 cw(c4772.72,5975) 4791.42,5899.53 4880,5870 4968.58,5899.53 cw(c4987.28,5975) 4909.53,5975